# Allegro board 887904-1111_UPDATED.brd
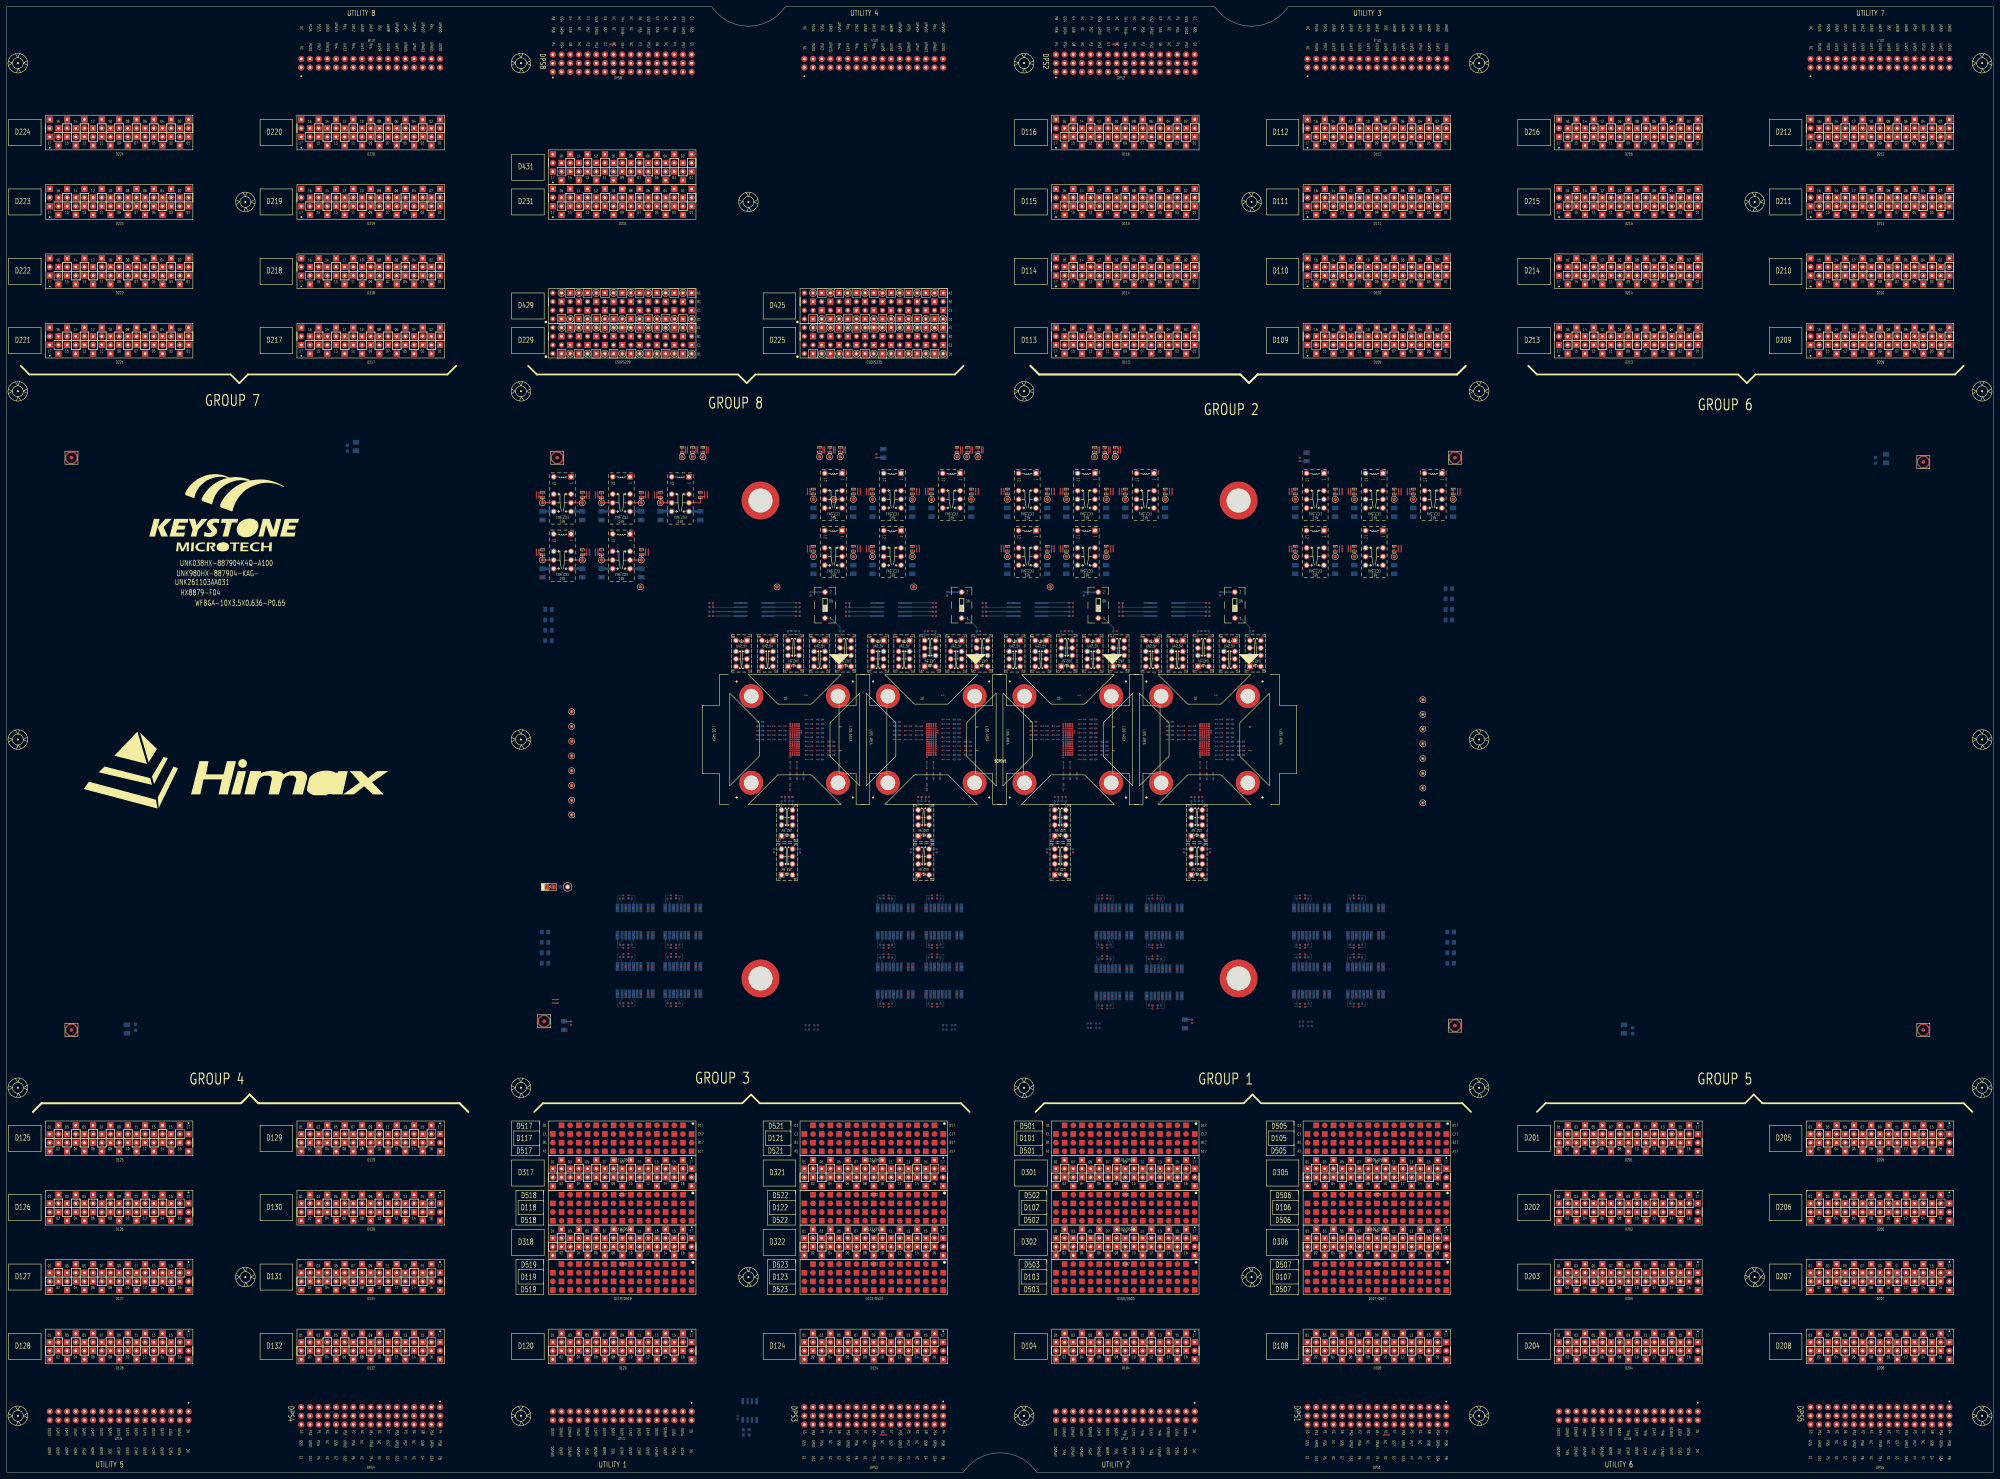
[diagram p0: board, top side]
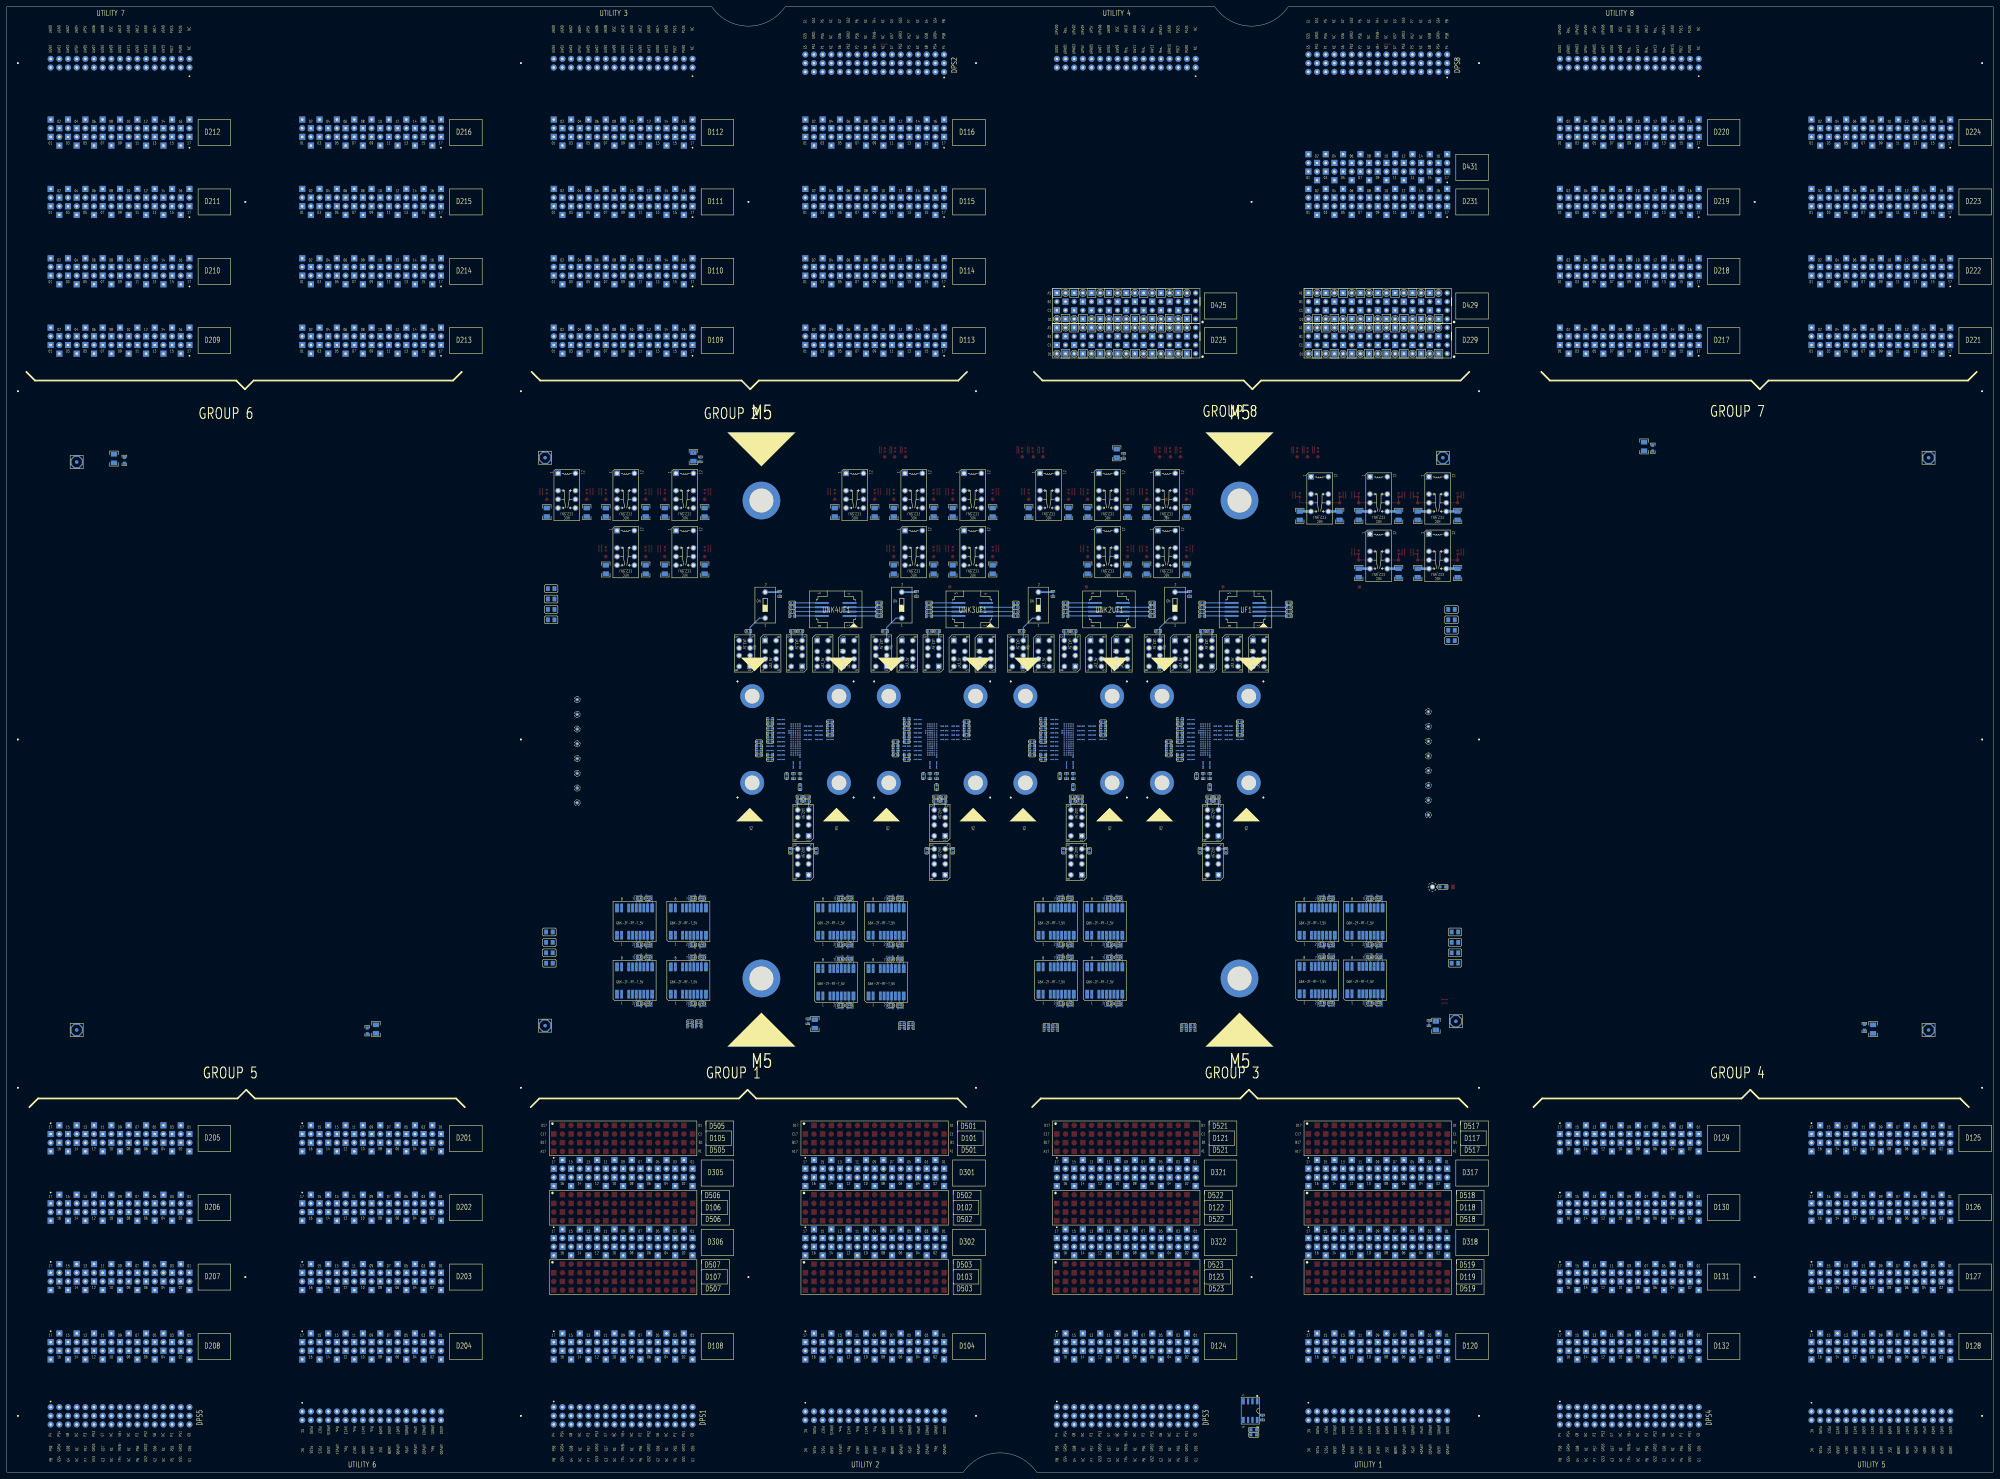
[diagram p1: board, bottom side, seen from below]

Outline 581.66 x 429.26 mm; copper layers: TOP, L02_GND, L03_SIGNAL, L04_GND, L05_SIGNAL, L06_GND, L07_SIGNAL, L08_GND, L09_POWER, L10_GND, L11_POWER, L12_GND, L13_POWER, L14_GND, L15_POWER, L16_GND, L17_POWER, L18_GND, L19_POWER, L20_GND, L21_POWER, L22_GND, L23_POWER, L24_GND, L25_5V, L26_CBIT, L27_GND, L28_SIGNAL, L29_GND, L30_SIGNAL, L31_GND, L32_SIGNAL, L33_GND, BOTTOM. Coordinates in mm from the lower left corner of the outline.

## Design rules (mm)
net group DIFFPAIR0: nets S1_AUX+ S1_AUX-

## Placement (name value [footprint] x y rotation side)
BD29  BD120-3A-S8  [FB0805]  157.6 149.1 180 bottom
BD30  BD120-3A-S8  [FB0805]  157.6 158.24 180 bottom
BD31  BD120-3A-S8  [FB0805]  157.6 155.19 180 bottom
BD32  BD120-3A-S8  [FB0805]  157.6 152.15 180 bottom
BD33  BD120-3A-S8  [FB0805]  422.78 158.24 180 bottom
BD34  BD120-3A-S8  [FB0805]  422.78 149.1 180 bottom
BD35  BD120-3A-S8  [FB0805]  422.78 152.15 180 bottom
BD36  BD120-3A-S8  [FB0805]  422.78 155.19 180 bottom
BD37  BD120-3A-S8  [FB0805]  158.62 252.73 180 bottom
BD38  BD120-3A-S8  [FB0805]  158.62 249.68 180 bottom
BD39  BD120-3A-S8  [FB0805]  158.62 246.63 180 bottom
BD40  BD120-3A-S8  [FB0805]  158.62 243.59 180 bottom
BD41  BD120-3A-S8  [FB0805]  422.27 249.68 180 bottom
BD42  BD120-3A-S8  [FB0805]  422.27 258.83 180 bottom
BD43  BD120-3A-S8  [FB0805]  422.27 255.78 180 bottom
BD44  BD120-3A-S8  [FB0805]  422.27 252.73 180 bottom
C1  0.1U-16-X-S4-MU  [C0402]  231.64 250.82 0 bottom
C53  0.1U-16-X-S4-MU  [C0402]  234.43 129.67 180 bottom
C54  0.1U-16-X-S4-MU  [C0402]  236.97 129.67 180 bottom
C55  0.1U-16-X-S4-MU  [C0402]  235.32 257.3 90 bottom
C67  1U-10-X-S4-MU  [C0402]  220.62 217.23 180 bottom
C69  10U-25-X7R-SA  [C1206]  168.52 263.42 270 bottom
C70  10U-25-X7R-SA  [C1206]  156.84 263.42 270 bottom
C71  1U-10-X-S4-MU  [C0402]  241.42 211.38 0 bottom
C73  1U-10-X-S4-MU  [C0402]  238.17 215.28 0 bottom
C75  1U-10-X-S4-MU  [C0402]  241.42 212.68 0 bottom
C77  1U-10-X-S4-MU  [C0402]  238.17 216.58 0 bottom
C79  1U-10-X-S4-MU  [C0402]  231.35 203.91 270 bottom
C81  1U-10-X-S4-MU  [C0402]  229.4 203.91 270 bottom
C83  1U-10-X-S4-MU  [C0402]  238.17 220.48 0 bottom
C85  1U-10-X-S4-MU  [C0402]  238.17 210.08 0 bottom
C87  1U-10-X-S4-MU  [C0402]  220.62 218.53 180 bottom
C89  10U-25-X7R-SA  [C1206]  185.79 280.18 270 bottom
C90  10U-25-X7R-SA  [C1206]  174.11 280.18 270 bottom
C91  10U-25-X7R-SA  [C1206]  203.07 280.18 270 bottom
C92  10U-25-X7R-SA  [C1206]  191.38 280.18 270 bottom
C93  10U-25-X7R-SA  [C1206]  168.52 280.18 270 bottom
C94  10U-25-X7R-SA  [C1206]  156.84 280.18 270 bottom
C95  10U-25-X7R-SA  [C1206]  185.79 263.42 270 bottom
C96  10U-25-X7R-SA  [C1206]  174.11 263.42 270 bottom
CA1  NC/2.2U-10-X-S4-MU  [C0402]  168.52 269.49 90 top
CA2  NC/2.2U-10-X-S4-MU  [C0402]  185.79 286.26 90 top
CA3  NC/2.2U-10-X-S4-MU  [C0402]  191.38 286.26 90 top
CA4  NC/2.2U-10-X-S4-MU  [C0402]  168.52 286.26 90 top
CA5  NC/2.2U-10-X-S4-MU  [C0402]  156.84 286.26 90 top
CA6  NC/2.2U-10-X-S4-MU  [C0402]  185.79 269.49 90 top
CA7  NC/2.2U-10-X-S4-MU  [C0402]  174.11 286.26 90 top
CA8  NC/2.2U-10-X-S4-MU  [C0402]  174.11 269.49 90 top
CA9  NC/2.2U-10-X-S4-MU  [C0402]  156.84 269.49 90 top
CA10  NC/2.2U-10-X-S4-MU  [C0402]  203.07 286.26 90 top
CA12  NC/2.2U-10-X-S4-MU  [C0402]  203.83 299.47 90 top
CA13  NC/2.2U-10-X-S4-MU  [C0402]  197.73 299.47 90 top
CA14  NC/2.2U-10-X-S4-MU  [C0402]  200.78 299.47 90 top
CB1  0.1U-16-X-S4-MU  [C0402]  165.22 131.56 270 bottom
CB2  10U-25-X7R-SA  [C1206]  163.19 130.81 90 bottom
CB3  0.1U-16-X-S4-MU  [C0402]  347.08 132.07 270 bottom
CB4  10U-25-X7R-SA  [C1206]  345.05 131.32 90 bottom
CB5  0.1U-16-X-S4-MU  [C0402]  378.58 296.68 90 bottom
CB6  10U-25-X7R-SA  [C1206]  380.61 297.43 270 bottom
CB7  0.1U-16-X-S4-MU  [C0402]  254.63 297.7 90 bottom
CB8  10U-25-X7R-SA  [C1206]  256.66 298.45 270 bottom
CB9  0.1U-25-X-S6  [C0603]  37.71 130.3 270 bottom
CB10  10U-25-X7R-SA  [C1206]  35.17 129.79 270 bottom
CB11  0.1U-25-X-S6  [C0603]  476.12 129.29 270 bottom
CB12  10U-25-X7R-SA  [C1206]  473.58 129.79 270 bottom
CB13  0.1U-25-X-S6  [C0603]  547.24 296.42 90 bottom
CB14  10U-25-X7R-SA  [C1206]  550.28 296.93 90 bottom
CB15  0.1U-25-X-S6  [C0603]  99.69 299.97 90 bottom
CB16  10U-25-X7R-SA  [C1206]  102.23 300.48 90 bottom
CB19  0.1U-16-X-S4-MU  [C0402]  213.99 16 90 bottom
CC1  0.47U-10-X6S-S2-TY  [C0201]  223.87 214.63 180 bottom
CC2  0.47U-10-X6S-S2-TY  [C0201]  223.87 215.93 180 bottom
CC3  0.47U-10-X6S-S2-TY  [C0201]  223.87 217.23 180 bottom
CC4  0.47U-10-X6S-S2-TY  [C0201]  220.62 214.63 180 bottom
CC5  0.47U-10-X6S-S2-TY  [C0201]  234.92 217.88 0 bottom
CC6  0.47U-10-X6S-S2-TY  [C0201]  238.17 211.38 0 bottom
CC7  0.47U-10-X6S-S2-TY  [C0201]  234.92 213.98 0 bottom
CC8  0.47U-10-X6S-S2-TY  [C0201]  234.92 215.28 0 bottom
CC9  0.47U-10-X6S-S2-TY  [C0201]  238.17 212.68 0 bottom
CC10  0.47U-10-X6S-S2-TY  [C0201]  234.92 216.58 0 bottom
CC11  0.47U-10-X6S-S2-TY  [C0201]  231.35 207.16 270 bottom
CC12  0.47U-10-X6S-S2-TY  [C0201]  229.4 207.16 270 bottom
CC13  0.47U-10-X6S-S2-TY  [C0201]  234.92 220.48 0 bottom
CC14  0.47U-10-X6S-S2-TY  [C0201]  234.92 208.78 0 bottom
CC15  0.47U-10-X6S-S2-TY  [C0201]  223.87 218.53 180 bottom
CD1  0.1U-10-X7R-S2-MU  [C0201]  227.12 215.93 180 bottom
CD2  0.1U-10-X7R-S2-MU  [C0201]  231.02 217.23 0 bottom
CD3  0.1U-10-X7R-S2-MU  [C0201]  227.12 217.23 180 bottom
CD4  0.1U-10-X7R-S2-MU  [C0201]  227.12 214.63 180 bottom
CD5  0.1U-10-X7R-S2-MU  [C0201]  230.7 212.35 270 bottom
CD6  0.1U-10-X7R-S2-MU  [C0201]  234.92 211.38 0 bottom
CD7  0.1U-10-X7R-S2-MU  [C0201]  231.02 216.58 0 bottom
CD8  0.1U-10-X7R-S2-MU  [C0201]  232.32 216.58 0 bottom
CD9  0.1U-10-X7R-S2-MU  [C0201]  234.92 212.68 0 bottom
CD10  0.1U-10-X7R-S2-MU  [C0201]  232.32 217.23 0 bottom
CD11  0.1U-10-X7R-S2-MU  [C0201]  230.7 211.06 90 bottom
CD12  0.1U-10-X7R-S2-MU  [C0201]  229.4 209.75 270 bottom
CD13  0.1U-10-X7R-S2-MU  [C0201]  234.92 219.18 0 bottom
CD14  0.1U-10-X7R-S2-MU  [C0201]  234.92 210.08 0 bottom
CD15  0.1U-10-X7R-S2-MU  [C0201]  227.12 218.53 180 bottom
CSDPS225  V93K_CSDPS_DPS32  [PG_VG93K_PF_DPS32_G8D225]  253.87 331.47 0 top
CSDPS229  V93K_CSDPS_DPS32  [PG_VG93K_PF_DPS32_G8D229]  180.21 331.47 0 top
CSDPS425  V93K_CSDPS_DPS32  [PG_VG93K_PF_DPS32_G8D425]  253.87 341.63 0 top
CSDPS429  V93K_CSDPS_DPS32  [PG_VG93K_PF_DPS32_G8D429]  180.21 341.63 0 top
D101/D501  V93K_PS1600 HD  [PG_VG93K_F_HSM_G1D101_501_ND]  327.53 97.79 0 top
D102/D502  V93K_PS1600 HD  [PG_VG93K_F_HSM_G1D102_502_ND]  327.53 77.47 0 top
D103/D503  V93K_PS1600 HD  [PG_VG93K_F_HSM_G1D103_503_ND]  327.53 57.15 0 top
D104  V93K_CH  [PG_VG93K_F_G1D104]  327.53 36.83 0 top
D105/D505  V93K_PS1600 HD  [PG_VG93K_F_HSM_G1D105_505_ND]  401.19 97.79 0 top
D106/D506  V93K_PS1600 HD  [PG_VG93K_F_HSM_G1D106_506_ND]  401.19 77.47 0 top
D107/D507  V93K_PS1600 HD  [PG_VG93K_F_HSM_G1D107_507_ND]  401.19 57.15 0 top
D108  V93K_CH  [PG_VG93K_F_G1D108]  401.19 36.83 0 top
D109  V93K_CH  [PG_VG93K_F_G2D109]  401.19 331.47 0 top
D110  V93K_CH  [PG_VG93K_F_G2D110]  401.19 351.79 0 top
D111  V93K_CH  [PG_VG93K_F_G2D111]  401.19 372.11 0 top
D112  V93K_CH  [PG_VG93K_F_G2D112]  401.19 392.43 0 top
D113  V93K_CH  [PG_VG93K_F_G2D113]  327.53 331.47 0 top
D114  V93K_CH  [PG_VG93K_F_G2D114]  327.53 351.79 0 top
D115  V93K_CH  [PG_VG93K_F_G2D115]  327.53 372.11 0 top
D116  V93K_CH  [PG_VG93K_F_G2D116]  327.53 392.43 0 top
D117/D517  V93K_PS1600 HD  [PG_VG93K_F_HSM_G3D117_517_ND]  180.21 97.79 0 top
D118/D518  V93K_PS1600 HD  [PG_VG93K_F_HSM_G3D118_518_ND]  180.21 77.47 0 top
D119/D519  V93K_PS1600 HD  [PG_VG93K_F_HSM_G3D119_519_ND]  180.21 57.15 0 top
D120  V93K_CH  [PG_VG93K_F_G3D120]  180.21 36.83 0 top
D121/D521  V93K_PS1600 HD  [PG_VG93K_F_HSM_G3D121_521_ND]  253.87 97.79 0 top
D122/D522  V93K_PS1600 HD  [PG_VG93K_F_HSM_G3D122_522_ND]  253.87 77.47 0 top
D123/D523  V93K_PS1600 HD  [PG_VG93K_F_HSM_G3D123_523_ND]  253.87 57.15 0 top
D124  V93K_CH  [PG_VG93K_F_G3D124]  253.87 36.83 0 top
D125  V93K_CH  [PG_VG93K_F_G4D125]  32.89 97.79 0 top
D126  V93K_CH  [PG_VG93K_F_G4D126]  32.89 77.47 0 top
D127  V93K_CH  [PG_VG93K_F_G4D127]  32.89 57.15 0 top
D128  V93K_CH  [PG_VG93K_F_G4D128]  32.89 36.83 0 top
D129  V93K_CH  [PG_VG93K_F_G4D129]  106.55 97.79 0 top
D130  V93K_CH  [PG_VG93K_F_G4D130]  106.55 77.47 0 top
D131  V93K_CH  [PG_VG93K_F_G4D131]  106.55 57.15 0 top
D132  V93K_CH  [PG_VG93K_F_G4D132]  106.55 36.83 0 top
D201  V93K_CH  [PG_VG93K_F_G5D201]  474.85 97.79 0 top
D202  V93K_CH  [PG_VG93K_F_G5D202]  474.85 77.47 0 top
D203  V93K_CH  [PG_VG93K_F_G5D203]  474.85 57.15 0 top
D204  V93K_CH  [PG_VG93K_F_G5D204]  474.85 36.83 0 top
D205  V93K_CH  [PG_VG93K_F_G5D205]  548.51 97.79 0 top
D206  V93K_CH  [PG_VG93K_F_G5D206]  548.51 77.47 0 top
D207  V93K_CH  [PG_VG93K_F_G5D207]  548.51 57.15 0 top
D208  V93K_CH  [PG_VG93K_F_G5D208]  548.51 36.83 0 top
D209  V93K_CH  [PG_VG93K_F_G6D209]  548.51 331.47 0 top
D210  V93K_CH  [PG_VG93K_F_G6D210]  548.51 351.79 0 top
D211  V93K_CH  [PG_VG93K_F_G6D211]  548.51 372.11 0 top
D212  V93K_CH  [PG_VG93K_F_G6D212]  548.51 392.43 0 top
D213  V93K_CH  [PG_VG93K_F_G6D213]  474.85 331.47 0 top
D214  V93K_CH  [PG_VG93K_F_G6D214]  474.85 351.79 0 top
D215  V93K_CH  [PG_VG93K_F_G6D215]  474.85 372.11 0 top
D216  V93K_CH  [PG_VG93K_F_G6D216]  474.85 392.43 0 top
D217  V93K_CH  [PG_VG93K_F_G7D217]  106.55 331.47 0 top
D218  V93K_CH  [PG_VG93K_F_G7D218]  106.55 351.79 0 top
D219  V93K_CH  [PG_VG93K_F_G7D219]  106.55 372.11 0 top
D220  V93K_CH  [PG_VG93K_F_G7D220]  106.55 392.43 0 top
D221  V93K_CH  [PG_VG93K_F_G7D221]  32.89 331.47 0 top
D222  V93K_CH  [PG_VG93K_F_G7D222]  32.89 351.79 0 top
D223  V93K_CH  [PG_VG93K_F_G7D223]  32.89 372.11 0 top
D224  V93K_CH  [PG_VG93K_F_G7D224]  32.89 392.43 0 top
D231  V93K_CH  [PG_VG93K_F_G8D231]  180.21 372.11 0 top
D301  V93K_CH  [PG_VG93K_F_G1D301]  327.53 87.63 0 top
D302  V93K_CH  [PG_VG93K_F_G1D302]  327.53 67.31 0 top
D305  V93K_CH  [PG_VG93K_F_G1D305]  401.19 87.63 0 top
D306  V93K_CH  [PG_VG93K_F_G1D306]  401.19 67.31 0 top
D317  V93K_CH  [PG_VG93K_F_G3D317]  180.21 87.63 0 top
D318  V93K_CH  [PG_VG93K_F_G3D318]  180.21 67.31 0 top
D321  V93K_CH  [PG_VG93K_F_G3D321]  253.87 87.63 0 top
D322  V93K_CH  [PG_VG93K_F_G3D322]  253.87 67.31 0 top
D431  V93K_CH  [PG_VG93K_F_G8D431]  180.21 382.27 0 top
DPS1  V93K_DPS  [PG_VG93K_F_G1DPS1]  401.19 16.51 0 top
DPS2  V93K_DPS  [PG_VG93K_F_G2DPS2]  327.53 412.75 0 top
DPS3  V93K_DPS  [PG_VG93K_F_G3DPS3]  253.87 16.51 0 top
DPS4  V93K_DPS  [PG_VG93K_F_G4DPS4]  106.55 16.51 0 top
DPS5  V93K_DPS  [PG_VG93K_F_G5DPS5]  548.51 16.51 0 top
DPS8  V93K_DPS  [PG_VG93K_F_G8DPS8]  180.21 412.75 0 top
FD1  -  [FD_040_V2]  157.35 132.08 0 top
FD2  -  [FD_040_V2]  424.05 130.81 0 top
FD3  -  [FD_040_V2]  424.05 297.18 0 top
FD4  -  [FD_040_V2]  161.16 297.18 0 top
FD5  -  [FD_040_V2]  18.92 129.54 0 top
FD6  -  [FD_040_V2]  561.21 129.54 0 top
FD7  -  [FD_040_V2]  561.21 295.91 0 top
FD8  -  [FD_040_V2]  18.92 297.18 0 top
FD9  -  [FD_040_V2]  157.35 132.08 180 bottom
FD10  -  [FD_040_V2]  424.05 130.81 180 bottom
FD11  -  [FD_040_V2]  424.05 297.18 180 bottom
FD12  -  [FD_040_V2]  161.16 297.18 180 bottom
FD13  -  [FD_040_V2]  18.92 129.54 180 bottom
FD14  -  [FD_040_V2]  561.21 129.54 180 bottom
FD15  -  [FD_040_V2]  561.21 295.91 180 bottom
FD16  -  [FD_040_V2]  18.92 297.18 180 bottom
GND1  TP01  [TP_040_T]  185.54 259.33 0 top
HX8879-F04  REF-CODE-CHIP  [CHIP_CODE]  56.51 257.81 0 top
K9  UA2-5NJ-A-V3  [RL_NECUA2_5V_V3]  228.47 189.99 270 bottom
K10  UA2-5NJ-A-V3  [RL_NECUA2_5V_V3]  245.61 239.63 270 bottom
K14  UA2-5NJ-A-V3  [RL_NECUA2_5V_V3]  215.13 240.03 90 bottom
K15  UA2-5NJ-A-V3  [RL_NECUA2_5V_V3]  222.75 240.03 90 bottom
K28  UA2-5NJ-A-V3  [RL_NECUA2_5V_V3]  230.37 239.63 270 bottom
K48  UA2-5NJ-A-V3  [RL_NECUA2_5V_V3]  237.99 240.03 90 bottom
K50  UA2-5NJ-A-V3  [RL_NECUA2_5V_V3]  228.47 178.56 270 bottom
K54  G6K-2F-RF-T-5V-SPECIAL  [RL_G6K2FRT_8P_5V_GR]  197.99 161.29 180 bottom
K55  EC2-5NJ-A  [RL_NECEC2_10P_5V]  162.68 268.48 90 bottom
K56  EC2-5NJ-A  [RL_NECEC2_10P_5V]  179.95 285.24 90 bottom
K57  EC2-5NJ-A  [RL_NECEC2_10P_5V]  197.22 285.24 90 bottom
K58  EC2-5NJ-A  [RL_NECEC2_10P_5V]  162.68 285.24 90 bottom
K59  EC2-5NJ-A  [RL_NECEC2_10P_5V]  179.95 268.48 90 bottom
K60  G6K-2F-RF-T-5V-SPECIAL  [RL_G6K2FRT_8P_5V_GR]  184.02 161.29 180 bottom
K61  G6K-2F-RF-T-5V-SPECIAL  [RL_G6K2FRT_8P_5V_GR]  184.02 144.14 180 bottom
K62  G6K-2F-RF-T-5V-SPECIAL  [RL_G6K2FRT_8P_5V_GR]  197.99 144.14 180 bottom
LDB1  LDB-2-S8  [LED_0805]  159.12 171.45 0 top
LOGO1  -  [LOGO_KT_KSMT]  60.57 274.07 0 top
LOGO2  LOGO_HX_Himax  [LOGO_HX_HIMAX]  65.65 200.41 0 top
LRB1  330-1-S6  [R0603]  161.16 171.45 180 bottom
NOREF  -  []  220.95 241.63 0 top
NOREF#2  -  []  355.52 211.06 90 top
NOREF#3  -  []  180.17 148.14 0 top
NOREF#4  -  []  197.44 140.15 0 top
NOREF#5  -  []  253.24 255.73 0 top
NOREF#6  -  []  349.08 209.16 0 top
NOREF#7  -  []  333.76 157.29 90 top
NOREF#8  -  []  242.61 245.28 0 top
NOREF#9  -  []  266.35 238.43 90 top
NOREF#10  -  []  266.52 215.61 90 top
NOREF#11  -  []  274.62 210.08 0 top
NOREF#12  -  []  314.62 213.98 0 top
NOREF#13  -  []  226.32 173.31 0 top
NOREF#14  -  []  268.22 234.38 0 top
NOREF#15  -  []  283.4 201.93 90 top
NOREF#16  -  []  192.79 165.29 0 top
NOREF#17  -  []  216.73 243.63 0 top
NOREF#18  -  []  184.57 148.14 0 top
NOREF#19  -  []  238.39 241.63 0 top
NOREF#20  -  []  189.64 156.84 90 top
NOREF#21  -  []  359.59 243.63 0 top
NOREF#22  -  []  229.08 209.16 90 top
NOREF#23  -  []  223.57 217.23 0 top
NOREF#24  -  []  268.87 180.16 0 top
NOREF#25  -  []  298.75 241.63 0 top
NOREF#26  -  []  264.14 248.93 90 top
NOREF#27  -  []  333.76 147.51 0 top
NOREF#28  -  []  334.89 250.82 90 top
NOREF#29  -  []  346.52 216.25 0 top
NOREF#30  -  []  332.7 195.63 90 top
NOREF#31  -  []  192.79 148.14 0 top
NOREF#32  -  []  376.49 158.56 90 top
NOREF#33  -  []  342.71 157.29 0 top
NOREF#34  -  []  346.52 217.55 0 top
NOREF#35  -  []  266.64 247.33 90 top
NOREF#36  -  []  305.47 184.21 0 top
NOREF#37  -  []  385.89 140.02 0 top
NOREF#38  -  []  230.72 216.58 0 top
NOREF#39  -  []  260.7 217.09 90 top
NOREF#40  -  []  272 210.08 90 top
NOREF#41  -  []  266.52 218.85 0 top
NOREF#42  -  []  269.66 140.57 90 top
NOREF#43  -  []  258.75 241.63 0 top
NOREF#44  -  []  272.07 176.96 90 top
NOREF#45  -  []  340.02 214.95 0 top
NOREF#46  -  []  211.13 241.63 0 top
NOREF#47  -  []  292.13 245.28 0 top
NOREF#48  -  []  303.57 217.23 0 top
NOREF#49  -  []  182.37 165.29 0 top
NOREF#50  -  []  239.59 250.2 90 top
NOREF#51  -  []  346.35 238.43 90 top
NOREF#52  -  []  351.02 210.46 90 top
NOREF#53  -  []  192.34 158.56 90 top
NOREF#54  -  []  232 210.08 90 top
NOREF#55  -  []  230.38 211.75 0 top
NOREF#56  -  []  231.72 216.26 0 top
NOREF#57  -  []  232.92 216.26 90 top
NOREF#58  -  []  220.02 214.31 90 top
NOREF#59  -  []  354.32 211.06 0 top
NOREF#60  -  []  274.62 220.48 0 top
NOREF#61  -  []  312 218.53 90 top
NOREF#62  -  []  253.87 167.19 0 top
NOREF#63  -  []  270.38 211.75 0 top
NOREF#64  -  []  398.43 165.29 0 top
NOREF#65  -  []  274.62 219.18 0 top
NOREF#66  -  []  211.24 258.13 0 top
NOREF#67  -  []  229.4 206.86 90 top
NOREF#68  -  []  266.37 241.23 0 top
NOREF#69  -  []  274.32 213.66 0 top
NOREF#70  -  []  270.38 211.66 0 top
NOREF#71  -  []  361.61 241.23 0 top
NOREF#72  -  []  275.52 214.96 90 top
NOREF#73  -  []  320.14 245.28 0 top
NOREF#74  -  []  323.4 201.93 90 top
NOREF#75  -  []  237.87 212.68 0 top
NOREF#76  -  []  178.82 165.29 0 top
NOREF#77  -  []  437.7 108.13 90 top
NOREF#78  -  []  306.82 214.63 0 top
NOREF#79  -  []  240.14 245.28 0 top
NOREF#80  -  []  329.21 238.03 90 top
NOREF#81  -  []  343.15 241.63 0 top
NOREF#82  -  []  340.7 217.09 90 top
NOREF#83  -  []  178.82 140.15 90 top
NOREF#84  -  []  363.81 241.23 0 top
NOREF#85  -  []  313.99 241.63 0 top
NOREF#86  -  []  304.47 191.59 0 top
NOREF#87  -  []  231.35 206.86 90 top
NOREF#88  -  []  227.37 234.38 0 top
NOREF#89  -  []  234.32 211.06 0 top
NOREF#90  -  []  296.73 243.63 0 top
NOREF#91  -  []  353.99 241.63 0 top
NOREF#92  -  []  213.7 231.63 0 top
NOREF#93  -  []  213.74 256.53 0 top
NOREF#94  -  []  323.7 204.63 90 top
NOREF#95  -  []  309.4 209.46 90 top
NOREF#96  -  []  319.45 140.06 90 top
NOREF#97  -  []  315.52 217.56 90 top
NOREF#98  -  []  342.99 250.83 90 top
NOREF#99  -  []  178.37 158.56 90 top
NOREF#100  -  []  332.61 137.61 90 top
NOREF#101  -  []  344.47 180.16 0 top
NOREF#102  -  []  324.77 147.51 0 top
NOREF#103  -  []  309.4 219.18 0 top
NOREF#104  -  []  345.47 184.74 0 top
NOREF#105  -  []  274.32 217.56 0 top
NOREF#106  -  []  223.27 215.61 90 top
NOREF#107  -  []  202.09 157.34 90 top
NOREF#108  -  []  546.79 295.57 0 top
NOREF#109  -  []  386.24 157.34 90 top
NOREF#110  -  []  188.12 140.2 90 top
NOREF#111  -  []  177.67 167.19 0 top
NOREF#112  -  []  348.57 241.23 0 top
NOREF#113  -  []  225.47 184.21 0 top
NOREF#114  -  []  258.75 241.63 0 top
NOREF#115  -  []  334.18 140.06 90 top
NOREF#116  -  []  311.72 216.26 0 top
NOREF#117  -  []  234.32 213.66 0 top
NOREF#118  -  []  339.51 165.29 0 top
NOREF#119  -  []  304.47 180.16 0 top
NOREF#120  -  []  311.62 216.91 90 top
NOREF#121  -  []  251.13 241.63 0 top
NOREF#122  -  []  352.02 217.23 0 top
NOREF#123  -  []  381.59 157.29 0 top
NOREF#124  -  []  314.32 214.96 0 top
NOREF#125  -  []  348.22 234.38 0 top
NOREF#126  -  []  277.57 211.06 0 top
NOREF#127  -  []  355.52 217.56 90 top
NOREF#128  -  []  300.7 217.09 90 top
NOREF#129  -  []  345.47 184.21 0 top
NOREF#130  -  []  308.87 180.16 0 top
NOREF#131  -  []  267.37 234.38 0 top
NOREF#132  -  []  268.79 158.56 90 top
NOREF#133  -  []  266.52 218.21 90 top
NOREF#134  -  []  307.37 245.28 0 top
NOREF#135  -  []  268.09 167.19 0 top
NOREF#136  -  []  260.02 214.95 0 top
NOREF#137  -  []  263.27 217.55 0 top
NOREF#138  -  []  312.07 176.96 90 top
NOREF#139  -  []  315.52 211.06 90 top
NOREF#140  -  []  348.2 279.63 90 top
NOREF#141  -  []  229.4 209.46 90 top
NOREF#142  -  []  343.27 214.31 90 top
NOREF#143  -  []  346.67 180.16 0 top
NOREF#144  -  []  343.27 216.91 90 top
NOREF#145  -  []  266.52 214.95 0 top
NOREF#146  -  []  260.77 148.02 0 top
NOREF#147  -  []  359.59 236.03 0 top
NOREF#148  -  []  354.32 214.96 0 top
NOREF#149  -  []  333.33 241.63 0 top
NOREF#150  -  []  303.57 215.93 0 top
NOREF#151  -  []  275.52 208.46 90 top
NOREF#152  -  []  232.92 216.91 90 top
NOREF#153  -  []  336.21 157.29 0 top
NOREF#154  -  []  266.67 191.59 0 top
NOREF#155  -  []  183.47 157.29 0 top
NOREF#156  -  []  226.52 214.31 90 top
NOREF#157  -  []  201.74 140.15 0 top
NOREF#158  -  []  310.38 211.66 0 top
NOREF#159  -  []  272.02 217.23 0 top
NOREF#160  -  []  327.7 197.63 90 top
NOREF#161  -  []  278.54 157.34 90 top
NOREF#162  -  []  264.32 157.34 90 top
NOREF#163  -  []  275.52 217.56 90 top
NOREF#164  -  []  235.52 218.86 90 top
NOREF#165  -  []  226.67 180.16 0 top
NOREF#166  -  []  235.52 220.16 90 top
NOREF#167  -  []  375.79 138.12 90 top
NOREF#168  -  []  318.39 241.63 0 top
NOREF#169  -  []  306.52 218.21 90 top
NOREF#170  -  []  354.62 210.08 0 top
NOREF#171  -  []  178.82 157.29 90 top
NOREF#172  -  []  349.4 219.18 0 top
NOREF#173  -  []  354.62 215.28 0 top
NOREF#174  -  []  304.35 243.63 0 top
NOREF#175  -  []  196.34 148.14 0 top
NOREF#176  -  []  262.99 250.83 90 top
NOREF#177  -  []  317.87 212.68 0 top
NOREF#178  -  []  229.08 209.16 0 top
NOREF#179  -  []  346.52 214.31 90 top
NOREF#180  -  []  255.44 140.57 90 top
NOREF#181  -  []  243.7 224.63 0 top
NOREF#182  -  []  254.89 250.82 90 top
NOREF#183  -  []  270.59 165.29 0 top
NOREF#184  -  []  260.77 165.29 0 top
NOREF#185  -  []  392.68 157.29 90 top
NOREF#186  -  []  322.61 245.28 0 top
NOREF#187  -  []  212.13 245.28 0 top
NOREF#188  -  []  386.24 140.07 90 top
NOREF#189  -  []  303.27 218.21 90 top
NOREF#190  -  []  332.61 167.19 0 top
NOREF#191  -  []  274.32 216.26 0 top
NOREF#192  -  []  306.82 215.93 0 top
NOREF#193  -  []  181.27 140.15 0 top
NOREF#194  -  []  229.08 206.56 90 top
NOREF#195  -  []  234.62 219.18 0 top
NOREF#196  -  []  274.32 214.96 0 top
NOREF#197  -  []  282.61 245.28 0 top
NOREF#198  -  []  306.52 216.91 90 top
NOREF#199  -  []  389.89 204.16 90 top
NOREF#200  -  []  274.62 211.38 0 top
NOREF#201  -  []  315.52 214.96 90 top
NOREF#202  -  []  310.72 217.23 0 top
NOREF#203  -  []  354.32 218.86 0 top
NOREF#204  -  []  274.62 215.28 0 top
NOREF#205  -  []  333.76 139.51 90 top
NOREF#206  -  []  333.31 158.56 90 top
NOREF#207  -  []  323.81 241.23 0 top
NOREF#208  -  []  251.7 233.63 0 top
NOREF#209  -  []  278.77 211.06 90 top
NOREF#210  -  []  303.27 214.95 0 top
NOREF#211  -  []  224.47 180.16 0 top
NOREF#212  -  []  313.99 241.63 0 top
NOREF#213  -  []  234.62 216.58 0 top
NOREF#214  -  []  351.03 206.56 90 top
NOREF#215  -  []  403.51 156.84 90 top
NOREF#216  -  []  333.24 255.73 0 top
NOREF#217  -  []  264.47 191.59 0 top
NOREF#218  -  []  226.52 218.21 90 top
NOREF#219  -  []  213.33 241.63 0 top
NOREF#220  -  []  310.7 212.05 90 top
NOREF#221  -  []  233.99 241.63 0 top
NOREF#222  -  []  333.76 165.29 0 top
NOREF#223  -  []  281.61 241.23 0 top
NOREF#224  -  []  273.97 238.03 90 top
NOREF#225  -  []  266.52 217.55 0 top
NOREF#226  -  []  334.18 157.84 90 top
NOREF#227  -  []  270.72 217.23 0 top
NOREF#228  -  []  377.36 157.84 90 top
NOREF#229  -  []  278.77 212.36 90 top
NOREF#230  -  []  340.32 214.63 0 top
NOREF#231  -  []  392.68 148.02 0 top
NOREF#232  -  []  256.37 165.29 0 top
NOREF#233  -  []  346.67 191.59 0 top
NOREF#234  -  []  229.4 219.18 0 top
NOREF#235  -  []  352.92 216.26 90 top
NOREF#236  -  []  355.52 209.76 90 top
NOREF#237  -  []  308.57 241.23 0 top
NOREF#238  -  []  346.52 214.95 0 top
NOREF#239  -  []  280.06 139.57 90 top
NOREF#240  -  []  349.4 209.46 90 top
NOREF#241  -  []  350.7 210.76 90 top
NOREF#242  -  []  278.19 140.02 0 top
NOREF#243  -  []  235.52 216.26 90 top
NOREF#244  -  []  275.52 218.86 90 top
NOREF#245  -  []  258.57 148.02 0 top
NOREF#246  -  []  225.47 195.64 0 top
NOREF#247  -  []  293.33 241.63 0 top
NOREF#248  -  []  275.72 204.55 0 top
NOREF#249  -  []  300.02 214.95 0 top
NOREF#250  -  []  308.87 191.59 0 top
NOREF#251  -  []  198.54 148.14 0 top
NOREF#252  -  []  353.97 238.03 90 top
NOREF#253  -  []  317.57 212.36 0 top
NOREF#254  -  []  350.77 241.23 0 top
NOREF#255  -  []  291.24 258.13 0 top
NOREF#256  -  []  270.7 212.05 90 top
NOREF#257  -  []  336.73 236.03 0 top
NOREF#258  -  []  259.75 245.28 0 top
NOREF#259  -  []  354.62 208.78 0 top
NOREF#260  -  []  264.47 191.59 0 top
NOREF#261  -  []  160.22 170.73 90 top
NOREF#262  -  []  234.62 220.48 0 top
NOREF#263  -  []  195.24 157.29 0 top
NOREF#264  -  []  228.87 180.16 0 top
NOREF#265  -  []  327.97 157.29 0 top
NOREF#266  -  []  256.37 148.02 0 top
NOREF#267  -  []  251.13 241.63 0 top
NOREF#268  -  []  219.75 245.28 0 top
NOREF#269  -  []  226.52 218.85 0 top
NOREF#270  -  []  178.37 141.42 90 top
NOREF#271  -  []  242.61 245.28 0 top
NOREF#272  -  []  412.53 273.64 0 top
NOREF#273  -  []  271.62 216.91 90 top
NOREF#274  -  []  266.52 216.91 90 top
NOREF#275  -  []  255.02 148.02 0 top
NOREF#276  -  []  237.07 257.31 0 top
NOREF#277  -  []  350.42 216.26 0 top
NOREF#278  -  []  315.52 208.46 90 top
NOREF#279  -  []  303.27 218.85 0 top
NOREF#280  -  []  391.53 167.19 0 top
NOREF#281  -  []  271.35 206.86 90 top
NOREF#282  -  []  339.75 245.28 0 top
NOREF#283  -  []  355.52 218.86 90 top
NOREF#284  -  []  255.02 140.02 90 top
NOREF#285  -  []  269.24 140.02 90 top
NOREF#286  -  []  235.52 217.56 90 top
NOREF#287  -  []  306.35 238.43 90 top
NOREF#288  -  []  234.32 209.76 0 top
NOREF#289  -  []  310.38 211.75 90 top
NOREF#290  -  []  355.52 214.96 90 top
NOREF#291  -  []  306.32 184.74 0 top
NOREF#292  -  []  241.59 238.43 90 top
NOREF#293  -  []  354.32 220.16 0 top
NOREF#294  -  []  268.57 241.23 0 top
NOREF#295  -  []  143.7 321.13 0 top
NOREF#296  -  []  283.7 224.63 0 top
NOREF#297  -  []  211.7 233.63 0 top
NOREF#298  -  []  354.62 220.48 0 top
NOREF#299  -  []  270.38 211.75 90 top
NOREF#300  -  []  375.79 155.39 90 top
NOREF#301  -  []  351.35 206.86 90 top
NOREF#302  -  []  349.4 219.18 0 top
NOREF#303  -  []  220.7 217.09 90 top
NOREF#304  -  []  272.92 216.26 90 top
NOREF#305  -  []  235.52 208.46 90 top
NOREF#306  -  []  235.52 214.96 90 top
NOREF#307  -  []  352 210.08 90 top
NOREF#308  -  []  270.77 241.23 0 top
NOREF#309  -  []  340.95 241.63 0 top
NOREF#310  -  []  323.67 139.51 0 top
NOREF#311  -  []  231.03 206.56 90 top
NOREF#312  -  []  362.61 234.38 0 top
NOREF#313  -  []  307.37 245.28 0 top
NOREF#314  -  []  224.9 245.28 0 top
NOREF#315  -  []  310.38 211.75 0 top
NOREF#316  -  []  177.67 150.04 0 top
NOREF#317  -  []  359.59 250.2 90 top
NOREF#318  -  []  337.31 147.51 0 top
NOREF#319  -  []  337.28 245.28 0 top
NOREF#320  -  []  243.7 204.63 90 top
NOREF#321  -  []  275.52 209.76 90 top
NOREF#322  -  []  328.7 233.63 0 top
NOREF#323  -  []  363.4 201.93 90 top
NOREF#324  -  []  187.77 157.29 0 top
NOREF#325  -  []  314.62 208.78 0 top
NOREF#326  -  []  273.89 140.02 0 top
NOREF#327  -  []  354.62 217.88 0 top
NOREF#328  -  []  343.57 215.93 0 top
NOREF#329  -  []  184.57 165.29 0 top
NOREF#330  -  []  314.62 216.58 0 top
NOREF#331  -  []  329.85 139.06 90 top
NOREF#332  -  []  338.41 157.29 0 top
NOREF#333  -  []  306.52 217.55 0 top
NOREF#334  -  []  314.32 211.06 0 top
NOREF#335  -  []  392.24 158.56 90 top
NOREF#336  -  []  235.52 213.66 90 top
NOREF#337  -  []  156.49 172.45 0 top
NOREF#338  -  []  376.94 148.02 0 top
NOREF#339  -  []  263.27 214.31 90 top
NOREF#340  -  []  274.62 212.68 0 top
NOREF#341  -  []  263.27 216.25 0 top
NOREF#342  -  []  314.62 215.28 0 top
NOREF#343  -  []  274.32 218.86 0 top
NOREF#344  -  []  309.08 206.56 90 top
NOREF#345  -  []  274.32 208.46 0 top
NOREF#346  -  []  316.59 248.76 90 top
NOREF#347  -  []  293.24 255.73 0 top
NOREF#348  -  []  311.62 216.26 90 top
NOREF#349  -  []  304.14 248.93 90 top
NOREF#350  -  []  264.47 180.16 0 top
NOREF#351  -  []  202.09 140.2 90 top
NOREF#352  -  []  273.99 241.63 0 top
NOREF#353  -  []  353.99 241.63 0 top
NOREF#354  -  []  323.7 224.63 0 top
NOREF#355  -  []  274.32 220.16 0 top
NOREF#356  -  []  292.7 195.63 90 top
NOREF#357  -  []  305.47 184.74 0 top
NOREF#358  -  []  335.53 241.63 0 top
NOREF#359  -  []  249.21 238.03 90 top
NOREF#360  -  []  236.19 241.63 0 top
NOREF#361  -  []  230.72 217.23 0 top
NOREF#362  -  []  263.27 214.95 0 top
NOREF#363  -  []  314.62 212.68 0 top
NOREF#364  -  []  357.57 211.06 0 top
NOREF#365  -  []  336.73 243.63 0 top
NOREF#366  -  []  235.52 209.76 90 top
NOREF#367  -  []  310.77 241.23 0 top
NOREF#368  -  []  378.29 148.02 0 top
NOREF#369  -  []  272.79 165.29 0 top
NOREF#370  -  []  391.53 149.92 0 top
NOREF#371  -  []  272.02 216.58 0 top
NOREF#372  -  []  354.32 217.56 0 top
NOREF#373  -  []  239.59 236.03 0 top
NOREF#374  -  []  274.62 217.88 0 top
NOREF#375  -  []  306.52 214.31 90 top
NOREF#376  -  []  283.81 241.23 0 top
NOREF#377  -  []  344.47 180.16 0 top
NOREF#378  -  []  303.27 216.25 0 top
NOREF#379  -  []  266.32 184.74 0 top
NOREF#380  -  []  331.7 233.63 0 top
NOREF#381  -  []  317.57 211.06 0 top
NOREF#382  -  []  338.75 241.63 0 top
NOREF#383  -  []  336.44 258.13 0 top
NOREF#384  -  []  218.73 238.43 90 top
NOREF#385  -  []  269.24 165.29 0 top
NOREF#386  -  []  314.32 208.46 0 top
NOREF#387  -  []  393.11 157.84 90 top
NOREF#388  -  []  266.32 173.31 0 top
NOREF#389  -  []  354.32 216.26 0 top
NOREF#390  -  []  338 227.33 0 top
NOREF#391  -  []  355.52 212.36 90 top
NOREF#392  -  []  315.52 213.66 90 top
NOREF#393  -  []  312.02 216.58 0 top
NOREF#394  -  []  333.31 140.78 90 top
NOREF#395  -  []  232.02 216.58 0 top
NOREF#396  -  []  401.98 140.07 90 top
NOREF#397  -  []  315.52 212.36 90 top
NOREF#398  -  []  299.75 245.28 0 top
NOREF#399  -  []  234.32 216.26 0 top
NOREF#400  -  []  234.32 220.16 0 top
NOREF#401  -  []  344.35 236.03 0 top
NOREF#402  -  []  223.57 218.53 0 top
NOREF#403  -  []  350.38 211.75 90 top
NOREF#404  -  []  291.7 228.68 45 top
NOREF#405  -  []  314.99 245.28 0 top
NOREF#406  -  []  266.82 217.23 0 top
NOREF#407  -  []  275.52 220.16 90 top
NOREF#408  -  []  379.39 157.29 0 top
NOREF#409  -  []  319.59 243.63 0 top
NOREF#410  -  []  226.52 217.55 0 top
NOREF#411  -  []  291.13 241.63 0 top
NOREF#412  -  []  328.32 157.34 90 top
NOREF#413  -  []  331.13 241.63 0 top
NOREF#414  -  []  192.79 140.15 90 top
NOREF#415  -  []  230.7 210.76 90 top
NOREF#416  -  []  235.52 212.36 90 top
NOREF#417  -  []  283.46 234.38 0 top
NOREF#418  -  []  263.57 218.53 0 top
NOREF#419  -  []  354.62 213.98 0 top
NOREF#420  -  []  273.89 157.29 0 top
NOREF#421  -  []  395.13 157.29 0 top
NOREF#422  -  []  320.37 147.51 0 top
NOREF#423  -  []  357.07 250.71 90 top
NOREF#424  -  []  194.14 148.14 0 top
NOREF#425  -  []  37.26 131.15 0 top
NOREF#426  -  []  331.13 241.63 0 top
NOREF#427  -  []  281.59 238.43 90 top
NOREF#428  -  []  274.62 213.98 0 top
NOREF#429  -  []  226.52 216.25 0 top
NOREF#430  -  []  357.87 211.38 0 top
NOREF#431  -  []  293.7 231.63 0 top
NOREF#432  -  []  225.47 173.31 0 top
NOREF#433  -  []  396.23 165.29 0 top
NOREF#434  -  []  233.97 238.03 90 top
NOREF#435  -  []  225.47 184.21 0 top
NOREF#436  -  []  179.24 140.69 90 top
NOREF#437  -  []  475.67 130.14 0 top
NOREF#438  -  []  260.77 165.29 0 top
NOREF#439  -  []  346.82 218.53 0 top
NOREF#440  -  []  271.69 140.02 0 top
NOREF#441  -  []  375.79 149.92 0 top
NOREF#442  -  []  229.08 206.56 0 top
NOREF#443  -  []  348.2 279.63 0 top
NOREF#444  -  []  237.07 250.71 90 top
NOREF#445  -  []  381.59 140.02 0 top
NOREF#446  -  []  189.64 139.69 90 top
NOREF#447  -  []  234.62 210.08 0 top
NOREF#448  -  []  248.7 233.63 0 top
NOREF#449  -  []  218 227.33 0 top
NOREF#450  -  []  273.99 241.63 0 top
NOREF#451  -  []  392.68 165.29 0 top
NOREF#452  -  []  338.41 139.51 0 top
NOREF#453  -  []  306.67 191.59 0 top
NOREF#454  -  []  317.07 250.71 90 top
NOREF#455  -  []  277.07 257.31 0 top
NOREF#456  -  []  217.28 245.28 0 top
NOREF#457  -  []  331.7 228.68 45 top
NOREF#458  -  []  347.37 234.38 0 top
NOREF#459  -  []  269.08 209.16 0 top
NOREF#460  -  []  274.99 148.02 0 top
NOREF#461  -  []  338.73 238.43 90 top
NOREF#462  -  []  376.94 157.29 90 top
NOREF#463  -  []  278.54 140.07 90 top
NOREF#464  -  []  278.19 157.29 0 top
NOREF#465  -  []  352.02 216.58 0 top
NOREF#466  -  []  230.38 211.75 90 top
NOREF#467  -  []  342.71 139.51 0 top
NOREF#468  -  []  242.61 234.38 0 top
NOREF#469  -  []  314.62 219.18 0 top
NOREF#470  -  []  354.32 208.46 0 top
NOREF#471  -  []  177.67 138.24 90 top
NOREF#472  -  []  211.7 228.68 45 top
NOREF#473  -  []  256.73 236.03 0 top
NOREF#474  -  []  253.87 155.39 90 top
NOREF#475  -  []  311.03 206.56 90 top
NOREF#476  -  []  203.7 224.63 0 top
NOREF#477  -  []  395.13 140.02 0 top
NOREF#478  -  []  360.14 245.28 0 top
NOREF#479  -  []  258.57 165.29 0 top
NOREF#480  -  []  361.59 238.43 90 top
NOREF#481  -  []  254.57 141.29 90 top
NOREF#482  -  []  268.09 138.12 90 top
NOREF#483  -  []  233.99 241.63 0 top
NOREF#484  -  []  266.67 180.16 0 top
NOREF#485  -  []  179.7 258.63 0 top
NOREF#486  -  []  314.62 210.08 0 top
NOREF#487  -  []  339.51 147.51 0 top
NOREF#488  -  []  357.87 212.68 0 top
NOREF#489  -  []  403.51 139.57 90 top
NOREF#490  -  []  272.07 188.39 90 top
NOREF#491  -  []  268.79 141.29 90 top
NOREF#492  -  []  208.7 233.63 0 top
NOREF#493  -  []  272 218.53 90 top
NOREF#494  -  []  276.19 241.63 0 top
NOREF#495  -  []  264.32 140.07 90 top
NOREF#496  -  []  223.27 218.85 0 top
NOREF#497  -  []  226.82 214.63 0 top
NOREF#498  -  []  275.52 212.36 90 top
NOREF#499  -  []  303.27 214.31 90 top
NOREF#500  -  []  271.72 216.26 0 top
NOREF#501  -  []  307.37 234.38 0 top
NOREF#502  -  []  344.14 248.93 90 top
NOREF#503  -  []  352.07 176.96 90 top
NOREF#504  -  []  298.73 238.43 90 top
NOREF#505  -  []  346.37 241.23 0 top
NOREF#506  -  []  380.49 148.02 0 top
NOREF#507  -  []  312.92 216.91 90 top
NOREF#508  -  []  393.11 140.57 90 top
NOREF#509  -  []  315.52 218.86 90 top
NOREF#510  -  []  362.61 245.28 0 top
NOREF#511  -  []  241.61 241.23 0 top
NOREF#512  -  []  332.13 245.28 0 top
NOREF#513  -  []  99.24 299.12 0 top
NOREF#514  -  []  308.22 234.38 0 top
NOREF#515  -  []  185.7 252.63 0 top
NOREF#516  -  []  263.57 217.23 0 top
NOREF#517  -  []  230.38 211.66 0 top
NOREF#518  -  []  306.82 217.23 0 top
NOREF#519  -  []  260.77 148.02 0 top
NOREF#520  -  []  263.27 215.61 90 top
NOREF#521  -  []  332.61 155.39 90 top
NOREF#522  -  []  360.7 144.63 90 top
NOREF#523  -  []  280.14 245.28 0 top
NOREF#524  -  []  270.42 216.26 0 top
NOREF#525  -  []  394.03 165.29 0 top
NOREF#526  -  []  215.53 241.63 0 top
NOREF#527  -  []  397.33 140.02 0 top
NOREF#528  -  []  362.61 245.28 0 top
NOREF#529  -  []  271.02 210.46 90 top
NOREF#530  -  []  343.27 216.25 0 top
NOREF#531  -  []  203.61 139.69 90 top
NOREF#532  -  []  343.57 218.53 0 top
NOREF#533  -  []  230.42 216.26 0 top
NOREF#534  -  []  183.47 140.15 0 top
NOREF#535  -  []  274.32 212.36 0 top
NOREF#536  -  []  220.02 214.95 0 top
NOREF#537  -  []  314.32 216.26 0 top
NOREF#538  -  []  326.01 241.23 0 top
NOREF#539  -  []  314.32 212.36 0 top
NOREF#540  -  []  396.23 148.02 0 top
NOREF#541  -  []  305.47 195.64 0 top
NOREF#542  -  []  315.72 204.55 0 top
NOREF#543  -  []  231.62 216.26 90 top
NOREF#544  -  []  303.27 216.91 90 top
NOREF#545  -  []  191.64 167.19 0 top
NOREF#546  -  []  277.57 212.36 0 top
NOREF#547  -  []  274.62 216.58 0 top
NOREF#548  -  []  263.97 140.02 0 top
NOREF#549  -  []  223.27 214.95 0 top
NOREF#550  -  []  361.61 241.23 0 top
NOREF#551  -  []  376.94 140.02 90 top
NOREF#552  -  []  346.52 218.85 0 top
NOREF#553  -  []  363.46 234.38 0 top
NOREF#554  -  []  318.77 211.06 90 top
NOREF#555  -  []  380.49 165.29 0 top
NOREF#556  -  []  234.62 212.68 0 top
NOREF#557  -  []  232.02 217.23 0 top
NOREF#558  -  []  270.42 216.91 0 top
NOREF#559  -  []  321.61 241.23 0 top
NOREF#560  -  []  265.84 156.84 90 top
NOREF#561  -  []  269.4 219.18 0 top
NOREF#562  -  []  258 227.33 0 top
NOREF#563  -  []  343.27 215.61 90 top
NOREF#564  -  []  223.27 216.25 0 top
NOREF#565  -  []  306.32 173.31 0 top
NOREF#566  -  []  313.97 238.03 90 top
NOREF#567  -  []  346.37 241.23 0 top
NOREF#568  -  []  264.64 249.73 90 top
NOREF#569  -  []  269.66 157.84 90 top
NOREF#570  -  []  235.72 204.55 0 top
NOREF#571  -  []  227.37 245.28 0 top
NOREF#572  -  []  266.52 214.31 90 top
NOREF#573  -  []  274.99 165.29 0 top
NOREF#574  -  []  345.47 195.64 0 top
NOREF#575  -  []  274.99 148.02 0 top
NOREF#576  -  []  337.31 165.29 0 top
NOREF#577  -  []  315.52 216.26 90 top
NOREF#578  -  []  336.21 139.51 0 top
NOREF#579  -  []  196.34 165.29 0 top
NOREF#580  -  []  184.57 165.29 0 top
NOREF#581  -  []  272.79 148.02 0 top
NOREF#582  -  []  234.62 213.98 0 top
NOREF#583  -  []  351.72 216.91 0 top
NOREF#584  -  []  306.52 216.25 0 top
NOREF#585  -  []  191.64 155.39 90 top
NOREF#586  -  []  271.62 216.26 90 top
NOREF#587  -  []  227.37 245.28 0 top
NOREF#588  -  []  194.14 165.29 0 top
NOREF#589  -  []  277.87 211.38 0 top
NOREF#590  -  []  291.13 241.63 0 top
NOREF#591  -  []  289.21 238.03 90 top
NOREF#592  -  []  256.44 258.13 0 top
NOREF#593  -  []  149.7 315.13 0 top
NOREF#594  -  []  387.76 156.84 90 top
NOREF#595  -  []  260.32 214.63 0 top
NOREF#596  -  []  348.87 180.16 0 top
NOREF#597  -  []  315.52 220.16 90 top
NOREF#598  -  []  267.37 245.28 0 top
NOREF#599  -  []  382.69 165.29 0 top
NOREF#600  -  []  253.87 138.12 90 top
NOREF#601  -  []  382.69 165.29 0 top
NOREF#602  -  []  349.08 209.16 90 top
NOREF#603  -  []  223.15 241.63 0 top
NOREF#604  -  []  401.7 170.63 90 top
NOREF#605  -  []  376.49 141.29 90 top
NOREF#606  -  []  193.21 140.69 90 top
NOREF#607  -  []  317.87 167.19 0 top
NOREF#608  -  []  254.57 158.56 90 top
NOREF#609  -  []  356.19 241.63 0 top
NOREF#610  -  []  232.07 176.96 90 top
NOREF#611  -  []  276.59 248.76 90 top
NOREF#612  -  []  251.7 228.68 45 top
NOREF#613  -  []  270.72 216.58 0 top
NOREF#614  -  []  338.75 241.63 0 top
NOREF#615  -  []  350.38 211.66 0 top
NOREF#616  -  []  310.42 216.26 0 top
NOREF#617  -  []  274.32 211.06 0 top
NOREF#618  -  []  271.69 157.29 0 top
NOREF#619  -  []  316.59 259.26 0 top
NOREF#620  -  []  265.47 184.21 0 top
NOREF#621  -  []  279.59 236.03 0 top
NOREF#622  -  []  264.35 243.63 0 top
NOREF#623  -  []  277.07 250.71 90 top
NOREF#624  -  []  224.64 249.73 90 top
NOREF#625  -  []  314.62 211.38 0 top
NOREF#626  -  []  354.99 245.28 0 top
NOREF#627  -  []  311.02 210.46 90 top
NOREF#628  -  []  304.47 180.16 0 top
NOREF#629  -  []  401.63 157.29 0 top
NOREF#630  -  []  322.57 165.29 0 top
NOREF#631  -  []  346.82 215.93 0 top
NOREF#632  -  []  226.52 214.95 0 top
NOREF#633  -  []  182.37 148.14 0 top
NOREF#634  -  []  264.9 245.28 0 top
NOREF#635  -  []  263.15 241.63 0 top
NOREF#636  -  []  259.67 157.29 0 top
NOREF#637  -  []  343.06 157.34 90 top
NOREF#638  -  []  178.82 148.14 0 top
NOREF#639  -  []  255.44 157.84 90 top
NOREF#640  -  []  314.62 217.88 0 top
NOREF#641  -  []  266.82 215.93 0 top
NOREF#642  -  []  349.14 227.66 0 top
NOREF#643  -  []  255.53 241.63 0 top
NOREF#644  -  []  237.57 212.36 0 top
NOREF#645  -  []  282.61 245.28 0 top
NOREF#646  -  []  198.54 165.29 0 top
NOREF#647  -  []  158.02 172.18 0 top
NOREF#648  -  []  345.47 184.21 0 top
NOREF#649  -  []  230.42 216.91 0 top
NOREF#650  -  []  354.62 219.18 0 top
NOREF#651  -  []  252.7 195.63 90 top
NOREF#652  -  []  260.02 214.31 90 top
NOREF#653  -  []  309.08 209.16 90 top
NOREF#654  -  []  354.62 212.68 0 top
NOREF#655  -  []  344.9 245.28 0 top
NOREF#656  -  []  234.62 211.38 0 top
NOREF#657  -  []  224.47 191.59 0 top
NOREF#658  -  []  237.57 211.06 0 top
NOREF#659  -  []  220.32 214.63 0 top
NOREF#660  -  []  263.27 218.21 90 top
NOREF#661  -  []  197.44 157.29 0 top
NOREF#662  -  []  318.77 212.36 90 top
NOREF#663  -  []  354.62 216.58 0 top
NOREF#664  -  []  333.7 231.63 0 top
NOREF#665  -  []  319.59 236.03 0 top
NOREF#666  -  []  306.67 180.16 0 top
NOREF#667  -  []  269.4 206.86 90 top
NOREF#668  -  []  354.32 213.66 0 top
NOREF#669  -  []  253.87 149.92 0 top
NOREF#670  -  []  269.4 209.46 90 top
NOREF#671  -  []  318.58 158.56 90 top
NOREF#672  -  []  223.57 215.93 0 top
NOREF#673  -  []  275.52 216.26 90 top
NOREF#674  -  []  306.37 241.23 0 top
NOREF#675  -  []  355.52 216.26 90 top
NOREF#676  -  []  321.47 139.51 0 top
NOREF#677  -  []  265.47 184.21 0 top
NOREF#678  -  []  269.4 219.18 0 top
NOREF#679  -  []  312.92 216.26 90 top
NOREF#680  -  []  312 210.08 90 top
NOREF#681  -  []  231.02 210.46 90 top
NOREF#682  -  []  343.57 214.63 0 top
NOREF#683  -  []  246.01 241.23 0 top
NOREF#684  -  []  398.43 148.02 0 top
NOREF#685  -  []  350.7 212.05 90 top
NOREF#686  -  []  357.57 212.36 0 top
NOREF#687  -  []  319.45 157.84 90 top
NOREF#688  -  []  345.47 195.64 0 top
NOREF#689  -  []  312.02 217.23 0 top
NOREF#690  -  []  265.84 139.57 90 top
NOREF#691  -  []  237.87 211.38 0 top
NOREF#692  -  []  223.27 216.91 90 top
NOREF#693  -  []  351.62 216.91 90 top
NOREF#694  -  []  263.97 157.29 0 top
NOREF#695  -  []  387.76 139.57 90 top
NOREF#696  -  []  351.72 216.26 0 top
NOREF#697  -  []  351.62 216.26 90 top
NOREF#698  -  []  311.35 206.86 90 top
NOREF#699  -  []  391.53 138.12 90 top
NOREF#700  -  []  317.87 149.41 0 top
NOREF#701  -  []  343.27 218.85 0 top
NOREF#702  -  []  255.02 157.29 90 top
NOREF#703  -  []  344.58 139.06 90 top
NOREF#704  -  []  319.59 250.2 90 top
NOREF#705  -  []  268.87 191.59 0 top
NOREF#706  -  []  322.57 147.51 0 top
NOREF#707  -  []  223.57 214.63 0 top
NOREF#708  -  []  306.52 218.85 0 top
NOREF#709  -  []  328.32 139.56 90 top
NOREF#710  -  []  323.46 234.38 0 top
NOREF#711  -  []  355.52 208.46 90 top
NOREF#712  -  []  385.89 157.29 0 top
NOREF#713  -  []  314.32 213.66 0 top
NOREF#714  -  []  258.73 238.43 90 top
NOREF#715  -  []  304.35 236.03 0 top
NOREF#716  -  []  343.06 139.56 90 top
NOREF#717  -  []  303.27 215.61 90 top
NOREF#718  -  []  391.53 155.39 90 top
NOREF#719  -  []  264.35 236.03 0 top
NOREF#720  -  []  401.63 140.02 0 top
NOREF#721  -  []  355.52 213.66 90 top
NOREF#722  -  []  181.27 157.29 0 top
NOREF#723  -  []  320.37 165.29 0 top
NOREF#724  -  []  260.95 241.63 0 top
NOREF#725  -  []  344.35 243.63 0 top
NOREF#726  -  []  232.07 188.39 90 top
NOREF#727  -  []  230.77 241.23 0 top
NOREF#728  -  []  263.27 218.85 0 top
NOREF#729  -  []  277.87 212.68 0 top
NOREF#730  -  []  198.54 148.14 0 top
NOREF#731  -  []  269.24 148.02 0 top
NOREF#732  -  []  263.57 215.93 0 top
NOREF#733  -  []  431.7 114.13 90 top
NOREF#734  -  []  343.27 218.21 90 top
NOREF#735  -  []  180.17 165.29 0 top
NOREF#736  -  []  343.27 214.95 0 top
NOREF#737  -  []  223.27 214.31 90 top
NOREF#738  -  []  333.74 256.53 0 top
NOREF#739  -  []  297.28 245.28 0 top
NOREF#740  -  []  192.79 157.29 90 top
NOREF#741  -  []  332.61 149.41 0 top
NOREF#742  -  []  311.03 206.56 0 top
NOREF#743  -  []  317.87 211.38 0 top
NOREF#744  -  []  275.52 211.06 90 top
NOREF#745  -  []  220.7 284.63 0 top
NOREF#746  -  []  263.27 216.91 90 top
NOREF#747  -  []  296.44 258.13 0 top
NOREF#748  -  []  229.4 219.18 0 top
NOREF#749  -  []  347.37 245.28 0 top
NOREF#750  -  []  311.14 196.91 90 top
NOREF#751  -  []  231.62 216.91 90 top
NOREF#752  -  []  195.24 140.15 0 top
NOREF#753  -  []  304.9 245.28 0 top
NOREF#754  -  []  160.92 170.45 90 top
NOREF#755  -  []  234.62 208.78 0 top
NOREF#756  -  []  268.09 149.92 0 top
NOREF#757  -  []  317.87 137.61 90 top
NOREF#758  -  []  331.24 258.13 0 top
NOREF#759  -  []  335.11 147.51 0 top
NOREF#760  -  []  309.08 209.16 0 top
NOREF#761  -  []  344.47 191.59 0 top
NOREF#762  -  []  234.32 214.96 0 top
NOREF#763  -  []  367.7 197.63 90 top
NOREF#764  -  []  253.74 256.53 0 top
NOREF#765  -  []  239.59 243.63 0 top
NOREF#766  -  []  256.73 243.63 0 top
NOREF#767  -  []  306.52 214.95 0 top
NOREF#768  -  []  222.99 250.83 90 top
NOREF#769  -  []  319.02 165.29 0 top
NOREF#770  -  []  343.27 217.55 0 top
NOREF#771  -  []  296.73 236.03 0 top
NOREF#772  -  []  321.59 238.43 90 top
NOREF#773  -  []  271.03 206.56 90 top
NOREF#774  -  []  319.02 147.51 0 top
NOREF#775  -  []  228.87 191.59 0 top
NOREF#776  -  []  358.39 241.63 0 top
NOREF#777  -  []  184.57 148.14 0 top
NOREF#778  -  []  198.54 165.29 0 top
NOREF#779  -  []  257.47 157.29 0 top
NOREF#780  -  []  294.89 250.82 90 top
NOREF#781  -  []  269.08 209.16 90 top
NOREF#782  -  []  265.47 195.64 0 top
NOREF#783  -  []  349.08 206.56 90 top
NOREF#784  -  []  350.38 211.75 0 top
NOREF#785  -  []  266.82 214.63 0 top
NOREF#786  -  []  243.46 234.38 0 top
NOREF#787  -  []  394.03 148.02 0 top
NOREF#788  -  []  302.99 250.83 90 top
NOREF#789  -  []  366.01 241.23 0 top
NOREF#790  -  []  314.32 217.56 0 top
NOREF#791  -  []  238.77 212.36 90 top
NOREF#792  -  []  315.52 209.76 90 top
NOREF#793  -  []  274.99 245.28 0 top
NOREF#794  -  []  347.37 245.28 0 top
NOREF#795  -  []  224.35 243.63 0 top
NOREF#796  -  []  344.64 249.73 90 top
NOREF#797  -  []  280.06 156.84 90 top
NOREF#798  -  []  223.27 218.21 90 top
NOREF#799  -  []  319.02 139.51 90 top
NOREF#800  -  []  318.58 140.78 90 top
NOREF#801  -  []  354.62 211.38 0 top
NOREF#802  -  []  211.13 241.63 0 top
NOREF#803  -  []  287.7 197.63 90 top
NOREF#804  -  []  187.77 140.15 0 top
NOREF#805  -  []  253.7 231.63 0 top
NOREF#806  -  []  324.77 165.29 0 top
NOREF#807  -  []  352.07 188.39 90 top
NOREF#808  -  []  298.75 241.63 0 top
NOREF#809  -  []  329.85 156.84 90 top
NOREF#810  -  []  226.82 215.93 0 top
NOREF#811  -  []  311.14 234.91 0 top
NOREF#812  -  []  225.47 184.74 0 top
NOREF#813  -  []  259.67 140.02 0 top
NOREF#814  -  []  257.47 140.02 0 top
NOREF#815  -  []  266.82 218.53 0 top
NOREF#816  -  []  281.61 241.23 0 top
NOREF#817  -  []  218.75 241.63 0 top
NOREF#818  -  []  203.7 204.63 90 top
NOREF#819  -  []  271.72 216.91 0 top
NOREF#820  -  []  323.67 157.29 0 top
NOREF#821  -  []  255.02 165.29 0 top
NOREF#822  -  []  179.24 157.84 90 top
NOREF#823  -  []  356.59 248.76 90 top
NOREF#824  -  []  375.79 167.19 0 top
NOREF#825  -  []  303.15 241.63 0 top
NOREF#826  -  []  322.61 234.38 0 top
NOREF#827  -  []  272.92 216.91 90 top
NOREF#828  -  []  354.32 209.76 0 top
NOREF#829  -  []  224.47 180.16 0 top
NOREF#830  -  []  282.61 234.38 0 top
NOREF#831  -  []  269.24 157.29 90 top
NOREF#832  -  []  306.82 218.53 0 top
NOREF#833  -  []  355.52 220.16 90 top
NOREF#834  -  []  226.67 191.59 0 top
NOREF#835  -  []  234.32 218.86 0 top
NOREF#836  -  []  358.77 212.36 90 top
NOREF#837  -  []  339.51 165.29 0 top
NOREF#838  -  []  226.52 215.61 90 top
NOREF#839  -  []  300.02 214.31 90 top
NOREF#840  -  []  350.72 216.58 0 top
NOREF#841  -  []  247.7 197.63 90 top
NOREF#842  -  []  306.37 241.23 0 top
NOREF#843  -  []  252.13 245.28 0 top
NOREF#844  -  []  346.32 184.74 0 top
NOREF#845  -  []  243.4 201.93 90 top
NOREF#846  -  []  346.82 214.63 0 top
NOREF#847  -  []  317.87 155.39 90 top
NOREF#848  -  []  271.03 206.56 0 top
NOREF#849  -  []  265.47 173.31 0 top
NOREF#850  -  []  382.69 148.02 0 top
NOREF#851  -  []  340.02 214.31 90 top
NOREF#852  -  []  358.77 211.06 90 top
NOREF#853  -  []  319.02 157.29 90 top
NOREF#854  -  []  191.64 150.04 0 top
NOREF#855  -  []  351.03 206.56 0 top
NOREF#856  -  []  193.21 157.84 90 top
NOREF#857  -  []  268.09 155.39 90 top
NOREF#858  -  []  314.32 218.86 0 top
NOREF#859  -  []  224.47 191.59 0 top
NOREF#860  -  []  235.52 211.06 90 top
NOREF#861  -  []  228.22 234.38 0 top
NOREF#862  -  []  305.47 173.31 0 top
NOREF#863  -  []  317.07 257.31 0 top
NOREF#864  -  []  270.59 148.02 0 top
NOREF#865  -  []  310.7 210.76 90 top
NOREF#866  -  []  191.64 138.24 90 top
NOREF#867  -  []  357.07 257.31 0 top
NOREF#868  -  []  216.73 236.03 0 top
NOREF#869  -  []  355.72 204.55 0 top
NOREF#870  -  []  226.35 238.43 90 top
NOREF#871  -  []  203.61 156.84 90 top
NOREF#872  -  []  346.82 217.23 0 top
NOREF#873  -  []  243.81 241.23 0 top
NOREF#874  -  []  230.7 212.05 90 top
NOREF#875  -  []  266.52 216.25 0 top
NOREF#876  -  []  226.37 241.23 0 top
NOREF#877  -  []  397.33 157.29 0 top
NOREF#878  -  []  349.4 206.86 90 top
NOREF#879  -  []  265.47 195.64 0 top
NOREF#880  -  []  372.7 195.63 90 top
NOREF#881  -  []  266.37 241.23 0 top
NOREF#882  -  []  257.28 245.28 0 top
NOREF#883  -  []  335.11 165.29 0 top
NOREF#884  -  []  234.99 245.28 0 top
NOREF#885  -  []  303.27 217.55 0 top
NOREF#886  -  []  346.52 215.61 90 top
NOREF#887  -  []  321.47 157.29 0 top
NOREF#888  -  []  298 227.33 0 top
NOREF#889  -  []  234.62 217.88 0 top
NOREF#890  -  []  348.87 191.59 0 top
NOREF#891  -  []  346.52 218.21 90 top
NOREF#892  -  []  306.52 215.61 90 top
NOREF#893  -  []  238.77 211.06 90 top
NOREF#894  -  []  274.62 208.78 0 top
NOREF#895  -  []  346.32 173.31 0 top
NOREF#896  -  []  398.43 148.02 0 top
NOREF#897  -  []  224.35 236.03 0 top
NOREF#898  -  []  288.7 233.63 0 top
NOREF#899  -  []  253.33 241.63 0 top
NOREF#900  -  []  188.12 157.34 90 top
NOREF#901  -  []  177.67 155.39 90 top
NOREF#902  -  []  263.57 214.63 0 top
NOREF#903  -  []  352.92 216.91 90 top
NOREF#904  -  []  305.47 184.21 0 top
NOREF#905  -  []  234.32 208.46 0 top
NOREF#906  -  []  306.64 247.33 90 top
NOREF#907  -  []  234.62 215.28 0 top
NOREF#908  -  []  279.59 250.2 90 top
NOREF#909  -  []  214.89 250.82 90 top
NOREF#910  -  []  283.7 204.63 90 top
NOREF#911  -  []  234.32 212.36 0 top
NOREF#912  -  []  321.61 241.23 0 top
NOREF#913  -  []  312.07 188.39 90 top
NOREF#914  -  []  310.72 216.58 0 top
NOREF#915  -  []  236.59 259.26 0 top
NOREF#916  -  []  216.44 258.13 0 top
NOREF#917  -  []  241.61 241.23 0 top
NOREF#918  -  []  291.7 233.63 0 top
NOREF#919  -  []  356.59 259.26 0 top
NOREF#920  -  []  251.24 258.13 0 top
NOREF#921  -  []  377.36 140.57 90 top
NOREF#922  -  []  378.29 165.29 0 top
NOREF#923  -  []  392.24 141.29 90 top
NOREF#924  -  []  192.34 141.42 90 top
NOREF#925  -  []  274.32 209.76 0 top
NOREF#926  -  []  349.08 206.56 0 top
NOREF#927  -  []  322.61 245.28 0 top
NOREF#928  -  []  224.14 248.93 90 top
NOREF#929  -  []  269.08 206.56 0 top
NOREF#930  -  []  376.94 165.29 0 top
NOREF#931  -  []  395.7 176.63 90 top
NOREF#932  -  []  226.52 216.91 90 top
NOREF#933  -  []  346.64 247.33 90 top
NOREF#934  -  []  392.68 140.02 90 top
NOREF#935  -  []  314.32 220.16 0 top
NOREF#936  -  []  379.39 140.02 0 top
NOREF#937  -  []  344.58 156.84 90 top
NOREF#938  -  []  401.98 157.34 90 top
NOREF#939  -  []  231.72 216.91 0 top
NOREF#940  -  []  346.52 216.91 90 top
NOREF#941  -  []  234.32 217.56 0 top
NOREF#942  -  []  304.47 191.59 0 top
NOREF#943  -  []  324.77 147.51 0 top
NOREF#944  -  []  305.47 195.64 0 top
NOREF#945  -  []  226.37 241.23 0 top
NOREF#946  -  []  264.47 180.16 0 top
NOREF#947  -  []  201.74 157.29 0 top
NOREF#948  -  []  314.32 209.76 0 top
NOREF#949  -  []  226.32 184.74 0 top
NOREF#950  -  []  354.32 212.36 0 top
NOREF#951  -  []  293.74 256.53 0 top
NOREF#952  -  []  223.27 217.55 0 top
NOREF#953  -  []  304.64 249.73 90 top
NOREF#954  -  []  276.59 259.26 0 top
NOREF#955  -  []  279.59 243.63 0 top
NOREF#956  -  []  350.72 217.23 0 top
NOREF#957  -  []  226.82 218.53 0 top
NOREF#958  -  []  311.72 216.91 0 top
NOREF#959  -  []  270.7 210.76 90 top
NOREF#960  -  []  382.69 148.02 0 top
NOREF#961  -  []  269.08 206.56 90 top
NOREF#962  -  []  309.08 206.56 0 top
NOREF#963  -  []  274.99 165.29 0 top
NOREF#964  -  []  231.03 206.56 0 top
NOREF#965  -  []  267.37 245.28 0 top
NOREF#966  -  []  278.39 241.63 0 top
NOREF#967  -  []  314.62 220.48 0 top
NOREF#968  -  []  226.82 217.23 0 top
NOREF#969  -  []  300.95 241.63 0 top
NOREF#970  -  []  225.47 195.64 0 top
NOREF#971  -  []  350.42 216.91 0 top
NOREF#972  -  []  344.47 191.59 0 top
NOREF#973  -  []  309.4 206.86 90 top
NOREF#974  -  []  265.47 184.74 0 top
NOREF#975  -  []  232 218.53 90 top
NOREF#976  -  []  316.19 241.63 0 top
